# Altium PCB Main_Power_Uint_3rd.PcbDoc (part 2 of 3)
Units mil, origin at the board's own origin, x right, y up, seen from the top; angles counter-clockwise.
Board outline 3820 x 5360 mil, 6 copper layers (Top Layer, GND1, PWR, SIG, GND2, Bottom Layer), stack 34.824 mil thick; 251 components, 157 nets, 795 pads, 616 vias.
Unrouted connection lines stored in the file: 8.
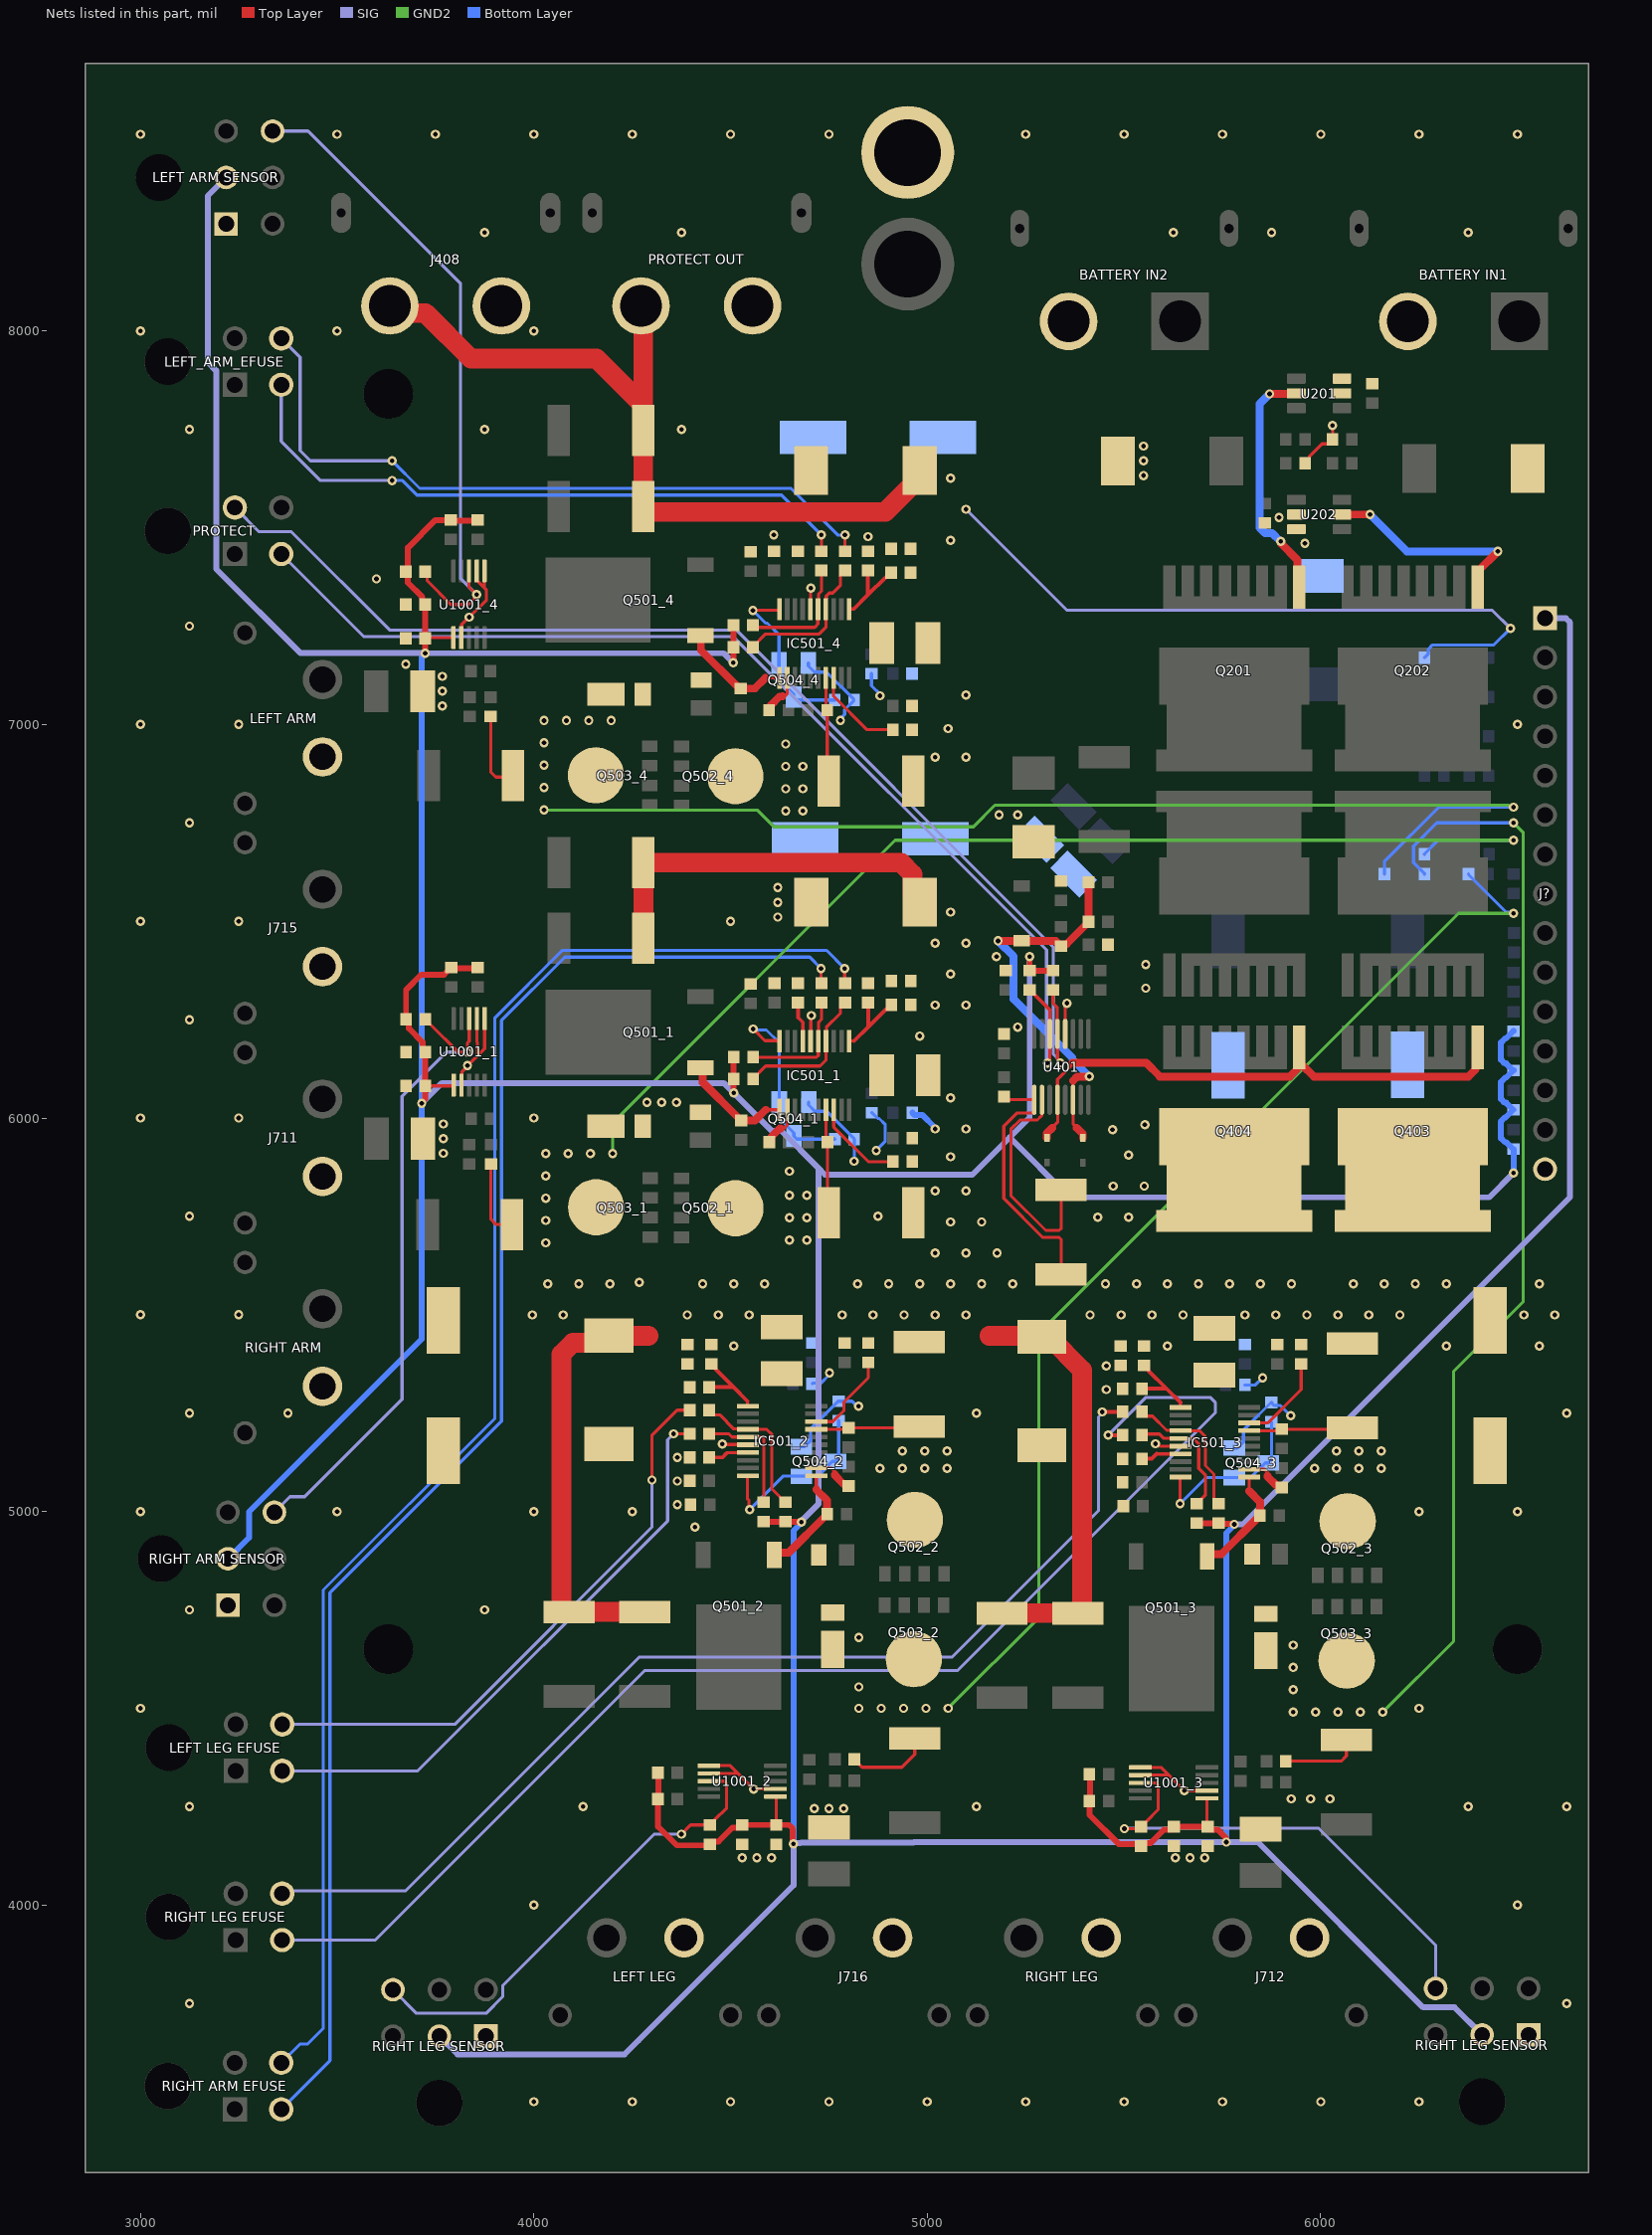
[diagram p6: the nets of this part, all layers, seen from the top]

## Part data
"48V OUT": library part CMP-019-000041-2, "XT_60 Connector FEMAIL", Design Item ID=XT_60F, Source=robit_connector.SchLib, System=Connector
"BATTERY IN1" "BATTERY IN2": library part CMP-019-000059-3, "Socket, DC supply, male, PIN: 2", Package=Package, Availability="Not in stock", Check_prices=https://www.snapeda.com/parts/XT60PW-M/AMASS/view-part/?ref=eda, Design Item ID=XT60PW-M, MF=AMASS, MP=XT60PW-M, Price=None, SnapEDA_Link=https://www.snapeda.com/parts/XT60PW-M/AMASS/view-part/?ref=snap, Source=robit_connector.SchLib, System=Connector
C201 C202 C203 C208 C502_1 C502_2 C502_3 C502_4 C507_1 C507_2 C507_3 C507_4 C1002_1 C1002_2 C1002_3 C1002_4 C1003_1 C1003_2 C1003_3 C1003_4: library part CMP-00021-3, "MLCC, 0.1µF, 10%, 100V, X7R, 0603", Capacitance=0.1µF, Dielectric=X7R, Package=0603, Tolerance=10%, Voltage Rating=100V, Mounting Type=SMD
C204 C205 C500_1 C500_2 C500_3 C500_4: library part UUX2A470MNL1GS, "Capacitor Polarised", Manufacturer_Name=Nichicon, Mouser Part Number=647-UUX2A470MNL1GS, Arrow Part Number=UUX2A470MNL1GS, Arrow Price/Stock=https://www.arrow.com/en/products/uux2a470mnl1gs/nichicon?utm_currency=USD&region=nac, Datasheet Link=https://componentsearchengine.com/Datasheets/1/UUX2A470MNL1GS.pdf, Height=10.5mm, Manufacturer_Part_Number=UUX2A470MNL1GS, Mouser Price/Stock=https://www.mouser.co.uk/ProductDetail/Nichicon/UUX2A470MNL1GS?qs=jZZh9D7uMhmPZMofMKn2Fg%3D%3D
C206 C207: library part CMP-00065-1, "MLCC, 4.7µF, 10%, 100V, X7R, 1210", Capacitance=4.7µF, Dielectric=X7R, Package=1210, Tolerance=10%, Voltage Rating=100V, Mounting Type=SMD
C401: library part CMP-00074-1, "MLCC, 470nF, 10%, 50V, X7R, 0603", Capacitance=470nF, Dielectric=X7R, Package=0603, Tolerance=10%, Voltage Rating=50V, Mounting Type=SMD
C403: library part CMP-00075-1, "MLCC, 47nF, 10%, 100V, X7R, 0603", Capacitance=47nF, Dielectric=X7R, Package=0603, Tolerance=10%, Voltage Rating=100V, Mounting Type=SMD
C501_1 C501_2 C501_3 C501_4: library part CMP-00030-3, "MLCC, 10µF, 10%, 100V, X7R, 1210", Capacitance=10µF, Dielectric=X7S, Package=1210, Tolerance=10%, Voltage Rating=100V, Mounting Type=SMD
C503_1 C503_2 C503_3 C503_4: library part CMP-00082-1, "MLCC, 22µF, 20%, 10V, X5R, 0603", Capacitance=22µF, Dielectric=X5R, Package=0603, Tolerance=20%, Voltage Rating=10V, Mounting Type=SMD
C505_1 C505_2 C505_3 C505_4: library part CMP-00088-1, "MLCC, 220nF, 10%, 25V, X7R, 0603", Capacitance=220nF, Dielectric=X7R, Package=0603, Tolerance=10%, Voltage Rating=25V, Mounting Type=SMD
C506_1 C506_2 C506_3 C506_4: library part CMP-00036-1, "MLCC, 1nF, 10%, 100V, X7R, 0603", Capacitance=1nF, Dielectric=X7R, Package=0603, Tolerance=10%, Voltage Rating=100V, Mounting Type=SMD
C508_1 C508_2 C508_3 C508_4: library part CMP-00046-1, "MLCC, 1nF, 10%, 50V, X7R, 0603", Capacitance=1nF, Dielectric=X7R, Package=0603, Tolerance=10%, Voltage Rating=50V, Mounting Type=SMD
C509_1 C509_2 C509_3 C509_4: library part CMP-00087-1, "MLCC, 470nF, 10%, 100V, C0G, 0805", Capacitance=470nF, Dielectric=X7R, Package=0805, Tolerance=10%, Voltage Rating=100V, Mounting Type=SMD
C1001_1 C1001_2 C1001_3 C1001_4: library part CMP-00023-3, "MLCC, 1µF, 10%, 100V, X7R, 0603", Capacitance=1uF, Dielectric=X7R, Package=1210, Tolerance=10%, Voltage Rating=100V, Mounting Type=SMD
C1004_1 C1004_2 C1004_3 C1004_4: library part CMP-00025-2, "MLCC, 1µF, 10%, 25V, X7R, 0603", Capacitance=1µF, Dielectric=X7R, Package=0603, Tolerance=10%, Voltage Rating=25V, Mounting Type=SMD
D201 D202 D203: "TVS Diode (Uni-directional)", Manufacturer_Name=LITTELFUSE, Mouser Part Number=576-SMDJ58A, Arrow Part Number=SMDJ58A, Arrow Price/Stock=https://www.arrow.com/en/products/smdj58a/littelfuse?utm_currency=USD&region=nac, Datasheet Link=https://mouser.componentsearchengine.com/Datasheets/2/SMDJ58A.pdf, Height=2.62mm, Manufacturer_Part_Number=SMDJ58A, Mouser Price/Stock=https://www.mouser.co.uk/ProductDetail/Littelfuse/SMDJ58A?qs=zL8PTTxXkF2zAaoXCy3ytQ%3D%3D
D401: library part CMP-1060-00175-1, "3 W Zener Voltage Regulator, 2-Pin SMB, Pb-Free, Tape and Reel", Manufacturer="On Semiconductor", ComponentLink1Description="Manufacturer URL", ComponentLink1URL=http://www.onsemi.com/, ComponentLink2Description=Datasheet, ComponentLink2URL=http://www.onsemi.com/pub_link/Collateral/1SMB5913BT3-D.PDF, ComponentLink3Description="Package Specification", ComponentLink3URL=http://www.onsemi.com/pub_link/Collateral/1SMB5913BT3-D.PDF, DatasheetVersion="Rev. 8", Mounting Technology="Surface Mount", PackageDescription="2-Pin Small Molded Package, J-Bend Lead, Body 4.33 x 3.625 mm", PackageReference=SMB-2-403A-03_H, PackageVersion="Rev. H, 05/2011", Packing="Tape and Reel", PartNumber=1SMB5945BT3G, RoHS=Pb-Free, VZ Typ (V)=68
D402 D403: library part CMP-301-000000-1, "Description", Manufacturer_Name=onsemi, Copyright="Copyright (C) 2025 Ultra Librarian. All rights reserved.", Design Item ID=SZMM5Z15VT1G, Manufacturer_Part_Number=SZMM5Z15VT1G, RefDes=RefDes, Source=SZMM5Z15VT1G.SchLib, Type=Type
D404: "Schottky Diode", Manufacturer_Name=MCC, Mouser Part Number=833-SMD110PL-TP, Arrow Part Number=SMD110PL-TP, Arrow Price/Stock=https://www.arrow.com/en/products/smd110pl-tp/micro-commercial-components?utm_currency=USD&region=europe, Datasheet Link=https://www.mccsemi.com/pdf/Products/SMD15PL-SMD1200PL(SOD-123FL).pdf, Height=1.35mm, Manufacturer_Part_Number=SMD110PL-TP, Mouser Price/Stock=https://www.mouser.co.uk/ProductDetail/Micro-Commercial-Components-MCC/SMD110PL-TP?qs=xjxbgUsuSIBtRX%252BtbqnRwQ%3D%3D
D501_1 D501_2 D501_3 D501_4: "TVS Diode (Uni-directional)", Manufacturer_Name=MCC, Datasheet Link=https://www.mccsemi.com/pdf/Products/SMLJ5.0AQ_SMLJ85CAQ(SMC).pdf, Height=2.823mm, Manufacturer_Part_Number=SMLJ58AQ-TP
D502_1 D502_2 D502_3 D502_4: library part CMP-2000-05099-1, "1 A High Voltage Schottky Barrier Rectifier, 0.62 V, -55 to 175 degC, 2- Pin POWERDI123, Pb-Free, Tape and Reel", Average Rectified Current-Max=1A, Forward Voltage=0.77V, Manufacturer="Diodes Inc", Peak Current-Max=40A, Reverse Current-Max=1µA, Reverse Voltage-Max [Vrrm]=100V, Datasheet URL=https://datasheet.ciiva.com/15144/getdatasheetpartid-44146-15144126.pdf, Datasheet Version=Sep-14, Manufacturer URL=http://www.diodes.com/
IC501_1 IC501_2 IC501_3 IC501_4: "Integrated Circuit", Manufacturer_Name="Texas Instruments", Datasheet Link=https://www.ti.com/lit/ds/slusee5c/slusee5c.pdf, Height=1.1mm, Manufacturer_Part_Number=TPS48111-Q1
J408 "PROTECT OUT": library part CMP-019-000058-2, "Socket DC Supply Connector Female", Package=Package, Availability="Not in stock", Check_prices=https://www.snapeda.com/parts/XT60PW-F/AMASS/view-part/?ref=eda, Design Item ID=XT60PW-F, MF=AMASS, MP=XT60PW-F, Price=None, SnapEDA_Link=https://www.snapeda.com/parts/XT60PW-F/AMASS/view-part/?ref=snap, Source=robit_connector.SchLib, System=Connector
J711 J712 J715 J716 "LEFT ARM" "LEFT LEG" "RIGHT ARM" "RIGHT LEG": "Connector", Manufacturer_Name=Amass, Datasheet Link=https://www.tme.eu/Document/ce4077e36b79046da520ca73227e15de/XT30PW%20SPEC.pdf, Height=5mm, Manufacturer_Part_Number=XT30PW-F
J?: "Connector", Manufacturer_Name="Wurth Elektronik", Datasheet Link=https://www.we-online.com/catalog/datasheet/61301511821.pdf, Height=8.65mm, Manufacturer_Part_Number=61301511821
"LEFT ARM SENSOR" "RIGHT ARM SENSOR" "RIGHT LEG SENSOR" "RIGHT LEG SENSOR": "Connector", Manufacturer_Name=Molex, Mouser Part Number=538-43045-0600, Arrow Part Number=43045-0600, Arrow Price/Stock=https://www.arrow.com/en/products/43045-0600/molex?region=nac, Datasheet Link=https://www.molex.com/pdm_docs/sd/430450200_sd.pdf, Height=9.9mm, Manufacturer_Part_Number=43045-0600, Mouser Price/Stock=https://www.mouser.co.uk/ProductDetail/Molex/43045-0600?qs=mrPiglD9aYJ8CzJ%2FE2PNbw%3D%3D
"LEFT LEG EFUSE" LEFT_ARM_EFUSE PROTECT "RIGHT ARM EFUSE" "RIGHT LEG EFUSE": library part CMP-04776-000002-1, "CONN HEADER R/A 4POS 3MM", Current Rating=8.5A, Manufacturer=Molex, Temperature="-40°C to +105°C", Temperature Range High=+105°C, Temperature Range Low=-40°C, Voltage Rating=600V, Automotive=No, Category=Conn, ComponentLink2Description=Datasheet, ComponentLink2URL=https://www.molex.com/webdocs/datasheets/pdf/en-us/0430450400_PCB_HEADERS.pdf, Conn Gender=Male, Conn Orientation="Right Angle", Contact Material=Tin,Nickel, Device Class L1=Connectors, Device Class L2="Headers and Wire Housings", Device Class L3=unset, Digikey Description="CONN HEADER R/A 4POS 3MM", Footprint Url=https://www.molex.com/pdm_docs/sd/430450400_sd.pdf, Height=9.27mm, Is Female=yes, Lead Free=Yes, Manufacturer Part Number=43045-0400, Number Of Contacts=4, Number of Rows=2, Octopart=https://octopart.com/43045-0400-molex-287063, Package=43045-0400, Pitch=3mm, RoHS=TRUE
Q201 Q202 Q401 Q402 Q403 Q404: "TRANS MOSFET N-CH 100V 300A 8HSOF", Digikey Part Number=IPT015N10N5ATMA1CT-ND, Manufacturer=Infineon, Mouser Part Number=726-IPT015N10N5ATMA1, Package=HSOF8, Part Number=IPT015N10N5, Temperature="-55°C to +175°C", Temperature Range High=+175°C, Temperature Range Low=-55°C, ComponentLink1Description=Upverter, ComponentLink1URL=https://upverter.com/upn/revision/59ddb1136ed40b7f/, ComponentLink2Description=Datasheet, ComponentLink2URL=http://www.infineon.com/dgdl/Infineon-IPT015N10N5-DS-v02_02-EN.pdf?fileId=5546d4624a75e5f1014ac94680661aff, Digikey Description="TRANS MOSFET N-CH 100V 300A 8HSOF", helpURL=https://upverter.com/upn/revision/59ddb1136ed40b7f/, Lead Free=yes, RoHS=TRUE, Supplier 1=Digi-Key, Supplier 2=Mouser, Supplier Part Number 1=IPT015N10N5ATMA1CT-ND, Supplier Part Number 2=726-IPT015N10N5ATMA1
Q501_1 Q501_2 Q501_3 Q501_4: library part CMP-1091-00169-1, "N-Channel OptiMOS 3 Power-Transistor, 100 V VDS, 90 A ID, -55 to 175 degC, PG-TO252-3-11, Reel, Green", Manufacturer=Infineon, ComponentLink1Description="Manufacturer URL", ComponentLink1URL=http://www.infineon.com/, ComponentLink2Description=Datasheet, ComponentLink2URL=http://www.infineon.com/dgdl/IPD068N10N3+G_Rev2.1.pdf?folderId=db3a304313b8b5a60113cee8763b02d7&fileId=db3a30431ce5fb52011d1eb7aeb615d1, ComponentLink3Description="Package Specification", ComponentLink3URL=http://www.infineon.com/dgdl/IPD160N04L_rev1.0.pdf?folderId=db3a3043163797a6011643468e7505a4&fileId=db3a3043163797a60116436401cf05cf, DatasheetVersion="Rev. 2.1", Green=TRUE, ID (max)="90Â A", IDpuls (max)="360Â A", Mounting Technology="Surface Mount", PackageDescription="3-Pin Plastic (Green) Transistor Single Outline Package, 6.57 x 6.1 mm Body, 2.29 mm Pitch", PackageReference=PG-TO252-3-11, PackageVersion="Rev. 02, 03/2007", Packing=Reel, PartNumber="IPD068N10N3 G", Polarity=N, Ptot (max)="150Â W", QG="51Â nC", RDS (on) (max)="6.8Â mOhm", Rth="1Â K/W", RthJA (max)="62 K/W", RthJC (max)="1 K/W", VDS (max)="100Â V", VGS(th) (max)="3.5Â V", VGS(th) (min)="2Â V"
Q502_1 Q502_2 Q502_3 Q502_4 Q503_1 Q503_2 Q503_3 Q503_4: library part CMP-00278-108017151-1, "NVMFS015N10MCLT1G Mosfet, N-Ch, 100V, 47.1A, Dfn Rohs Compliant: Yes", Manufacturer Lifecycle Status=ACTIVE, Lifecycle Status=Production, NexarPartId=108017151
Q504_1 Q504_2 Q504_3 Q504_4: library part CMP-1670-00008-1, "NPN General Purpose Amplifier, 40 V, 0.2 A, -55 to 150 degC, 3-Pin SOT23, RoHS, Tape and Reel", Capacitance="1.8E-11 f", Frequency="12.288 MHz", Frequency Tolerance=30ppm, Load Capacitance="18 pF", Max Operating Temperature=70degC, Min Operating Temperature=-20degC, Package Quantity=1000, ComponentLink1Description="Manufacturer URL", ComponentLink1URL=https://www.fairchildsemi.com/, ComponentLink2Description=Datasheet, ComponentLink2URL=https://www.fairchildsemi.com/datasheets/MM/MMBT3904.pdf, ComponentLink3Description="Package Specification", ComponentLink3URL=http://www.fairchildsemi.com/dwg/MA/MA03D.pdf, DatasheetVersion="Rev. 1.1.0, 10/2014", ESR="40 Ohm", Height="0.041 inch", Length="0.197 inch", Mount="Surface Mount", PackageDescription="3-Pin Small Outline Transistor, Body 2.92 x 1.325 mm, Pitch 0.95 mm", PackageReference=SOT23-3, Packaging="Tape and Reel", Pins=4, REACH SVHC="No SVHC", RoHSCompliant=True, Tolerance=30ppm, Width="0.126 inch"
R201 R202 R508_1 R508_2 R508_3 R508_4 R510_1 R510_2 R510_3 R510_4: library part CMP-00048-1, "Chip resistor, 100 Ohm, 1%, 0.1W, 0603", Package=0603, Power Rating=100mW, Resistance=100, Tolerance=1%, Voltage Rating=75V, Mounting Type=SMD
R203 R204 R205 R206 R207 R208 R413 R413_1 R413_2 R413_3 R413_4 R414 R414_1 R414_2 R414_3 R414_4: library part CMP-00064-1, "Chip resistor, 22k Ohm, 1%, 0.1W, 0603", Package=0603, Power Rating=100mW, Resistance=22k, Tolerance=1%, Voltage Rating=75V, Mounting Type=SMD
R401: library part CMP-00067-2, "Chip resistor, 464k Ohm, 1%, 0.1W, 0603", Package=0603, Power Rating=100mW, Resistance=464k, Tolerance=1%, Voltage Rating=75V, Mounting Type=SMD
R402: library part CMP-00068-1, "Chip resistor, 6.65k Ohm, 1%, 0.1W, 0603", Package=0603, Power Rating=100mW, Resistance=6.65k, Tolerance=1%, Voltage Rating=75V, Mounting Type=SMD
R403 R407 R415 R416 R515_1 R515_2 R515_3 R515_4 R516_1 R516_2 R516_3 R516_4: library part CMP-00032-1, "Chip resistor, 10k Ohm, 1%, 0.1W, 0603", Package=0603, Power Rating=100mW, Resistance=10k, Tolerance=1%, Voltage Rating=75V, Mounting Type=SMD
R404: library part CMP-00066-1, "Chip resistor, 2.2k Ohm, ±1%, 2W, 2512", Package=2512, Power Rating=2W, Resistance=2.2k, Tolerance=1%, Mounting Type=SMD
R405: library part CMP-00073-2, "Chip resistor, 1.3m Ohm, ±1%, 3W, 2512", Package=2512, Power Rating=3W, Resistance=1.3m, Tolerance=1%, Mounting Type=SMD
R406: library part CMP-00070-1, "Chip resistor, 442k Ohm, 1%, 0.1W, 0603", Package=0603, Power Rating=100mW, Resistance=442k, Tolerance=1%, Voltage Rating=75V, Mounting Type=SMD
R408: library part CMP-00069-1, "Chip resistor, 470 Ohm, 1%, 0.1W, 0603", Package=0603, Power Rating=100mW, Resistance=470, Tolerance=1%, Voltage Rating=75V, Mounting Type=SMD
R409 R410 R1003_1 R1003_2 R1003_3 R1003_4 R1004_1 R1004_2 R1004_3 R1004_4: library part CMP-00010-8, "Chip resistor, 10 Ohm, 1%, 0.1W, 0603", Package=0603, Power Rating=100mW, Resistance=10, Tolerance=1%, Voltage Rating=50V, Mounting Type=SMD
R501_1 R501_2 R501_3 R501_4: library part CMP-00071-1, "Chip resistor, 470k Ohm, 1%, 0.1W, 0603", Package=0603, Power Rating=100mW, Resistance=470k, Tolerance=1%, Voltage Rating=75V, Mounting Type=SMD
R502_1 R502_2 R502_3 R502_4: library part CMP-00072-1, "Chip resistor, 16.2k Ohm, 0.1%, 0.1W, 0603", Package=0603, Power Rating=100mW, Resistance=16.2k, Tolerance=1%, Voltage Rating=75V, Mounting Type=SMD
R503_1 R503_2 R503_3 R503_4: library part CMP-00076-1, "Chip resistor, 14.7k Ohm, 0.1%, 0.1W, 0603", Package=0603, Power Rating=100mW, Resistance=14.7k, Tolerance=1%, Voltage Rating=75V, Mounting Type=SMD
R504_1 R504_2 R504_3 R504_4: library part CMP-00090-1, "Chip resistor, 66k Ohm, 1%, 0.1W, 0603", Package=0603, Power Rating=100mW, Resistance=62k, Tolerance=1%, Voltage Rating=75V, Mounting Type=SMD
R505_1 R505_2 R505_3 R505_4 R506_1 R506_2 R506_3 R506_4 R1009_1 R1009_2 R1009_3 R1009_4: library part CMP-00012-6, "Chip resistor, 1k Ohm, 1%, 0.1W, 0603", Package=0603, Power Rating=100mW, Resistance=1k, Tolerance=1%, Voltage Rating=50V, Mounting Type=SMD
R509_1 R509_2 R509_3 R509_4: library part CMP-00079-1, "Chip resistor, 7.5k Ohm, 1%, 0.1W, 0603", Package=0603, Power Rating=100mW, Resistance=7.5k, Tolerance=1%, Voltage Rating=75V, Mounting Type=SMD
R511_1 R511_2 R511_3 R511_4: library part CMP-00089-1, "Chip resistor, 1m Ohm, ±1%, 3W, 2512", Package=2512, Power Rating=3W, Resistance=1m, Tolerance=1%, Mounting Type=SMD
R512_1 R512_2 R512_3 R512_4 R513_1 R513_2 R513_3 R513_4: library part CMP-00081-1, "Chip resistor, 220 Ohm, ±1%, 2W, 2512", Package=2512, Power Rating=2W, Resistance=220, Tolerance=1%, Mounting Type=SMD
R514_1 R514_2 R514_3 R514_4: library part CMP-00080-1, "Chip resistor, 220 Ohm, 1%, 0.1W, 0603", Package=0603, Power Rating=100mW, Resistance=220, Tolerance=1%, Voltage Rating=75V, Mounting Type=SMD
R1002_1 R1002_2 R1002_3 R1002_4: library part CMP-00015-10, "Chip resistor, 1m Ohm, ±1%, 5W, 2512", Package=2512, Power Rating=5W, Resistance=1m, Tolerance=1%, Mounting Type=SMD
R1005_1 R1005_2 R1005_3 R1005_4 R1006_1 R1006_2 R1006_3 R1006_4 R1008_1 R1008_2 R1008_3 R1008_4: library part CMP-00011-6, "Chip resistor, 4.7k Ohm, 1%, 0.1W, 0603", Package=0603, Power Rating=100mW, Resistance=4.7k, Tolerance=1%, Voltage Rating=75V, Mounting Type=SMD
U201 U202: library part CMP-026-000034-1, "5-V to 75-V 400-uA IQ ORing FET controller 6-SOT-23-THIN -40 to 125"
U401: library part CMP-0474-00539-1, "Surge Stopper with Ideal Diode, 4 to 80 V Vin, 16-pin SOP (MS-16), -40 to 85 degC, Pb-Free", Extended Temp="C, I, H", Manufacturer="Linear Technology", Power Good=no, Active Limiting=yes, Circuit Breaker Accuracy(%)=10, Circuit Breaker Threshold="50 mV", Circuit Breakers(#)=1, ComponentLink1Description="Manufacturer URL", ComponentLink1URL=http://www.linear.com/, ComponentLink2Description=Datasheet, ComponentLink2URL=http://cds.linear.com/docs/en/datasheet/436412f.pdf, ComponentLink3Description="Package Specification", ComponentLink3URL=http://cds.linear.com/docs/en/packaging/05081669_A_MS16.pdf, Fast Comparator=no, Mounting Technology="Surface Mount", PackageDescription="16-Pin Plastic MSOP, Body 4.04 x 3.00 mm, Pitch 0.50 mm", PackageReference=MS16, PackageVersion="Rev. Ã˜, 06/2010", PartNumber=LTC4364IMS-2#PBF, RoHS=TRUE, Vin Range="4 to 80 V"
U1001_1 U1001_2 U1001_3 U1001_4: library part CMP-303-000000-1, "85-V, 20-bit, ultra-precise, I2C output current/voltage/power/energy/charge monitor with alert", Package="VSSOP-10 Texas Instruments", Check_prices=https://www.snapeda.com/parts/INA228AIDGSR/Texas+Instruments/view-part/?ref=eda, Component Type=Standard, Design Item ID=INA228AIDGSR, MF="Texas Instruments", MP=INA228AIDGSR, Pin Count=10, SnapEDA_Link=https://www.snapeda.com/parts/INA228AIDGSR/Texas+Instruments/view-part/?ref=snap, Source=INA228AIDGSR.SchLib

## Free pads (board coordinates)
  round 125.98 hole 125.98 unplated: 3(3630,4650) 3(3630,7840) 3(6500,4650)

## Via types
v1: diameter 23.62, hole 11.81, Top Layer to Bottom Layer, tented both sides, 369 vias
v2: diameter 23.62, hole 11.81, Top Layer to Bottom Layer, 240 vias
v3: diameter 23.62, hole 11.81, Top Layer to Bottom Layer, tented top, 7 vias

## Nets (pads, with @x,y where several pads share a name; then routed paths per layer and width w, separated by ;. In a path a pad name is that pad's centre, name@x,y a point inside that pad or via, vN(x,y) a via of type N, cw(c..) or ccw(c..) an arc to the next point about the centre after c; other vN are vias at no path point)
3V3: "LEFT ARM SENSOR.2" "RIGHT ARM SENSOR.2" "RIGHT LEG SENSOR.2" C1003_1.2 C1003_2.2 C1003_3.2 C1003_4.2 C1004_1.2 C1004_2.2 C1004_3.2 C1004_4.2 J?.1 R415.1 R416.1 R515_1.1 R515_2.1 R515_3.1 R515_4.1 R516_1.1 R516_2.1 R516_3.1 R516_4.1 R1005_1.1 R1005_2.1 R1005_3.1 R1005_4.1 R1006_1.1 R1006_2.1 R1006_3.1 R1006_4.1 R1008_1.2 R1008_2.2 R1008_3.2 R1008_4.2 R1009_1.2 R1009_2.2 R1009_3.2 R1009_4.2 U1001_1.6 U1001_2.6 U1001_3.6 U1001_4.6 | length 20230.2
  Top Layer w8: C1003_4.2@3723.82,7218.62 3725.91,7220.71 U1001_4.6@3795.75,7220.71 ; C1003_1.2@3724.41,6081.44 3794.82,6081.44 3796.33,6082.95 U1001_1.6@3796.33,6083.53 ; U1001_2.6@4614.09,4275.35 4614.67,4275.35 4616.18,4273.84 C1003_2.2@4616.18,4203.43 ; U1001_3.6@5710.75,4271.06 5710.75,4201.23 C1003_3.2@5712.84,4199.14
  Top Layer w15: v2(3715.19,6037.62) 3715.19,6039.95 3724.42,6049.19 C1003_1.2@3724.42,6080.47 ; C1003_4.2@3723.82,7218.62 3723.82,7303.82 3724.81,7304.8 3716.56,7313.05 3716.56,7323.44 3679.52,7360.48 3679.52,7383.01 R1008_4.2@3674.61,7387.91 3679.87,7393.17 3679.87,7449.38 3749.89,7519.41 R1005_4.1@3789.22,7519.41 3790.75,7517.87 3855.62,7517.87 R1006_4.1@3857.16,7519.41 ; v2(3723.84,7181.19) C1003_4.2@3723.82,7218.62 ; C1003_1.2@3724.41,6080.48 3724.41,6166.64 3725.39,6167.62 3717.23,6175.78 3717.23,6192.77 3682.46,6227.54 3682.46,6243.47 R1008_1.2@3675.2,6250.73 3675.2,6325.64 3713.83,6364.28 3771.85,6364.28 3781.55,6373.98 3781.55,6374.96 3788.82,6382.23 R1005_1.1@3789.8,6382.23 3791.34,6380.69 3856.21,6380.69 R1006_1.1@3857.74,6382.23 ; R1006_2.1@4315.39,4336.76 4316.93,4335.22 4316.93,4270.36 R1005_2.1@4315.39,4268.82 4315.39,4199.54 4363.25,4151.69 4444.37,4151.69 4454.15,4161.48 4469.67,4161.48 4504.64,4196.45 4524.01,4196.45 4530.98,4203.43 C1003_2.2@4616.18,4203.43 4649.19,4203.44 4658.35,4194.28 4658.35,4156.84 v2(4660,4155.19) ; v2(4506.76,7156.73) 4507.15,7157.12 4507.15,7196.73 4507.15,7252 R516_4.1@4507.55,7252.4 ; R515_1.1@4507.58,6088.9 4507.58,6098.9 4507.97,6098.51 v2(4507.97,6063.58) ; R515_1.1@4507.97,6098.9 4507.58,6099.29 4507.58,6154.18 R516_1.1@4507.97,6154.57 ; R516_2.1@4584.33,4974.27 4584.73,4973.88 4640,4973.88 4679.61,4973.88 v2(4680,4973.48) ; v2(5260,6410) 5260,6374.92 R416.1@5259.68,6374.61 R415.1@5319.49,6374.61 ; R1006_3.1@5412.05,4332.47 5413.59,4330.94 5413.59,4266.07 R1005_3.1@5412.05,4264.53 5412.05,4229.43 5486.3,4155.18 5538.29,4155.18 R1008_3.2@5543.55,4149.93 5550.81,4157.19 5567.19,4157.19 5601.87,4191.87 5620.38,4191.87 5627.64,4199.14 C1003_3.2@5712.84,4199.14 5719.99,4191.98 5738.02,4191.98 5758.35,4171.65 5758.35,4161.65 v2(5760,4160) ; R516_3.1@5684.33,4970.79 5684.73,4970.39 5740,4970.39 5741.17,4969.22 5778.45,4969.22 v2(5780.01,4967.65)
  SIG w15: 3217.95,8390 3171.53,8343.58 3171.53,7920.21 3192.67,7899.06 3192.67,7395.42 3406.9,7181.19 v2(3723.84,7181.19) ; v2(3715.19,6037.62) 3766.47,6088.9 4482.66,6088.9 4604.07,5967.49 4628.6,5967.49 4723.04,5873.04 ; v2(3723.84,7181.19) 3723.92,7181.11 4482.38,7181.11 v2(4506.76,7156.73) ; 3760,3666.79 3806.42,3620.37 4230.37,3620.37 4265.64,3655.64 4660,4050 v2(4660,4155.19) 4661.65,4156.84 4677.16,4156.84 4679.31,4158.99 4965.26,4158.99 4966.26,4160 5840,4160 6260,3740 6340.08,3740 6410,3670.08 ; v2(4680,4973.48) 4680,4975.82 4723.04,5018.86 4723.04,5873.04 ; v2(5260,6410) 5260,6001.42 5209.29,5950.71 ; v2(5780.01,4967.65) 5802.29,4967.65 6633.62,5798.98 6633.62,7259 6622.62,7270 J?.1@6570,7270 ; v2(6490,5860) 6428.46,5798.46 5361.54,5798.46 5209.29,5950.71 ; 4723.04,5873.04 4740.1,5855.99 5114.57,5855.99 5209.29,5950.71
  Bottom Layer w15: 3222.63,4880 3276.36,4933.73 3276.36,4999.38 3715.19,5438.21 v2(3715.19,6037.62) ; v2@3717.18,6039.61 3715.19,6041.6 3715.19,7170.21 3723.84,7178.86 v2(3723.84,7181.19) ; v2(4660,4155.19) 4660,4951.15 4680,4971.15 v2(4680,4973.48) ; v2(5760,4160) 5760,4945.31 5780.01,4965.32 v2(5780.01,4967.65) ; v2(6490,5860) R1009_4.2@6490,5920.79 6489.02,5920.79 6471.15,5938.66 6467.5,5938.66 6457.75,5948.4 6457.75,5991.6 6467.42,6001.26 6469.49,6001.26 6489.02,6020.79 6471.07,6038.74 6467.42,6038.74 6457.75,6048.4 6457.75,6091.6 6468.36,6102.21 6470.43,6102.21 R1009_2.2@6489.02,6120.79 ; R1009_2.2@6490,6120.79 R1009_2.2@6489.02,6120.79 ; R1009_1.2@6490,6220.79 6489.02,6220.79 6470.43,6202.2 6468.36,6202.2 6457.75,6191.6 6457.75,6148.4 6467.42,6138.74 6471.07,6138.74 R1009_2.2@6489.02,6120.79
ALERT_1: "RIGHT ARM SENSOR.6" R1008_1.1 U1001_1.3 | length 1655.2
  Top Layer w8: R1008_1.1@3724.41,6250.73 3724.41,6249.74 3735.17,6238.98 3736.16,6238.98 3807.52,6167.62 v2(3831.43,6167.62) 3831.43,6191.16 3835.7,6195.43 U1001_1.3@3835.7,6252.82
  SIG w8: 3340.74,4998.11 3380.1,5037.47 3417.55,5037.47 3665,5284.92 3665,6055 3777.62,6167.62 v2(3831.43,6167.62)
ALERT_2: "RIGHT LEG SENSOR.6"@3641.89,3784.9 R1008_2.1 U1001_2.3 | length 1215.1
  Top Layer w8: v2(4374.98,4180) 4398.4,4203.43 R1008_2.1@4446.89,4203.43 ; U1001_2.3@4444.8,4314.72 4484.24,4314.72 4490,4308.96 4490,4246.53 4459.14,4215.67 4459.14,4214.69 R1008_2.1@4447.88,4203.43
  SIG w8: 3641.89,3784.9 3701.81,3724.98 3878.89,3724.98 3921.03,3767.12 3921.03,3795.36 4305.67,4180 v2(4374.98,4180)
ALERT_3: "RIGHT LEG SENSOR.6"@6291.89,3788.19 R1008_3.1 U1001_3.3 | length 1239.7
  Top Layer w8: v2(5500.95,4194.08) 5538.49,4194.08 R1008_3.1@5543.55,4199.14 ; U1001_3.3@5541.46,4310.43 5580.9,4310.43 5586.66,4304.67 5586.66,4242.25 5555.8,4211.39 5555.8,4210.4 R1008_3.1@5544.53,4199.14
  SIG w8: v2(5500.95,4194.08) 5502.19,4195.31 5994.69,4195.31 6291.89,3898.11 6291.89,3788.19
ALERT_4: "LEFT ARM SENSOR.6" R1008_4.1 U1001_4.3 | length 1702.8
  Top Layer w8: R1008_4.1@3723.82,7387.91 3729.17,7382.56 3729.17,7364.85 3789.22,7304.8 3833.83,7304.8 3854.8,7325.77 v2(3854.8,7330) 3854.18,7330 3835.12,7349.06 U1001_4.3@3835.12,7390
  SIG w8: 3336.06,8508.11 3425.93,8508.11 3814,8120.04 3814,7370.8 v2(3854.8,7330)
BST_1: C505_1.1 IC501_1.12 | length 107.4
  Top Layer w8: 4627.87,5973.9 4635.7,5973.9 4644.2,5982.4 IC501_1.12@4644.2,6020.95
  Top Layer w20: C505_1.1@4598.37,5938.51 4603.13,5943.27 4603.13,5951.44 4625.59,5973.9 4627.87,5973.9
BST_2: C505_2.1 IC501_2.12 | length 107.4
  Top Layer w8: IC501_2.12@4717.95,5110.5 4756.5,5110.5 4765,5102 4765,5094.17
  Top Layer w20: 4765,5094.17 4765,5091.88 4787.46,5069.43 4795.63,5069.43 C505_2.1@4800.39,5064.66
BST_3: C505_3.1 IC501_3.12 | length 107.4
  Top Layer w8: IC501_3.12@5817.95,5107.02 5856.5,5107.02 5865,5098.52 5865,5090.68
  Top Layer w20: 5865,5090.68 5865,5088.4 5887.46,5065.94 5895.63,5065.94 C505_3.1@5900.39,5061.18
BST_4: C505_4.1 IC501_4.12 | length 108.9
  Top Layer w8: 4632,7071.83 4637.97,7071.83 4643.78,7077.64 IC501_4.12@4643.78,7118.77
  Top Layer w20: C505_4.1@4597.94,7036.33 4602.7,7041.1 4602.7,7049.27 4624.52,7071.08 4631.25,7071.08 4632,7071.83
CS+_1: IC501_1.18 R510_1.1 | length 234.4
  Top Layer w8: IC501_1.18@4762.31,6020.95 4762.31,5977.09 4850.5,5888.9 R510_1.1@4916.3,5888.9
CS+_2: IC501_2.18 R510_2.1 | length 233.3
  Top Layer w8: IC501_2.18@4717.95,5228.61 4760.02,5228.61 4788.18,5256.76 4788.18,5278.26 4850,5340.08 R510_2.1@4850,5382.6
CS+_3: IC501_3.18 R510_3.1 | length 236.3
  Top Layer w8: IC501_3.18@5817.95,5225.13 5865.13,5225.13 5950,5310 R510_3.1@5950,5379.12
CS+_4: IC501_4.18 R510_4.1 | length 236.3
  Top Layer w8: IC501_4.18@4761.89,7118.78 4761.89,7071.6 4846.76,6986.73 R510_4.1@4915.88,6986.73
CS-_1: C506_1.2 IC501_1.17 Q502_1.5-6 R511_1.2 | length 265.1
  Top Layer w8: IC501_1.17@4742.63,6020.95 4742.63,5942.19 C506_1.2@4746.31,5938.51 4746.31,5762.5 R511_1.2@4749.9,5758.9
  other v3: 4650,5690 4693.98,5690 4650,5746.84 4693.98,5746.84 4650,5803.68 4693.98,5803.68 4650,5864.81
CS-_2: C506_2.2 IC501_2.17 Q502_2.5-6 R511_2.2 | length 265.1
  Top Layer w8: IC501_2.17@4717.95,5208.92 4796.71,5208.92 C506_2.2@4800.39,5212.6 4976.41,5212.6 R511_2.2@4980,5216.2
  other v1: 4879.48,5110 4936.32,5110 4993.16,5110 5050,5110 4936.32,5153.98 4993.16,5153.98 5050,5153.98
CS-_3: C506_3.2 IC501_3.17 Q502_3.5-6 R511_3.2 | length 265.1
  Top Layer w8: IC501_3.17@5817.95,5205.44 5896.71,5205.44 C506_3.2@5900.39,5209.12 6076.41,5209.12 R511_3.2@6080,5212.72
  other v1: 5983.92,5109.24 6040,5110 6096.84,5110 6153.68,5110 6040,5153.98 6096.84,5153.98 6153.68,5153.98
CS-_4: C506_4.2 IC501_4.17 Q502_4.5-6 R511_4.2 | length 265.1
  Top Layer w8: IC501_4.17@4742.2,7118.78 4742.2,7040.01 C506_4.2@4745.88,7036.33 4745.88,6860.32 R511_4.2@4749.48,6856.73
  other v1: 4640,6780 4683.98,6780 4640,6836.84 4683.98,6836.84 4640,6893.68 4683.98,6893.68 4640,6950.52
DGATE: D403.1 Q403.1 Q404.1 U401.4 | length 1397
  Top Layer w8: 5317.39,5974.89 5331.3,5988.81 5331.3,6045.86 U401.4@5330.83,6046.34 5330.83,6097.81 5362.74,6129.72 5362.74,6134 5368.74,6140
  Top Layer w20: D403.1@5303.85,5949.83 5303.85,5961.35 5317.39,5974.89 ; 5368.74,6140 5556.28,6140 5591.03,6105.25 5921.73,6105.25 5939.61,6123.13 5939.61,6134.25 Q404.1@5945.35,6140 ; Q404.1@5945.35,6179.37 Q404.1@5945.35,6140 ; Q403.1@6398.98,6179.37 6393.23,6173.62 6393.23,6123.13 6375.35,6105.25 5982.15,6105.25 5953.15,6134.25 5951.1,6134.25 Q404.1@5945.35,6140
DIOD_1: C508_1.1 IC501_1.10 Q504_1.1 Q504_1.3 | length 521
  Top Layer w8: v2(4557.19,6226.4) 4587.19,6196.4 4623.24,6196.4 IC501_1.10@4624.52,6195.12
  Bottom Layer w8: v2(4557.19,6226.4) 4559.95,6223.64 4591.02,6223.64 4623.66,6190.99 Q504_1.1@4623.66,6040.8 4623.66,5999.46 4661.06,5962.06 Q504_1.3@4661.06,5954.19 4668.94,5946.31 C508_1.1@4765.1,5946.32
DIOD_2: C508_2.1 IC501_2.10 Q504_2.1 Q504_2.3 | length 465.5
  Top Layer w8: IC501_2.10@4543.78,5090.81 4542.5,5089.53 4542.5,5032.57 4546.5,5028.57 4546.5,5006.41 v2(4548.15,5004.76)
  Bottom Layer w8: v2(4548.15,5004.76) 4633.18,5089.79 4721.4,5089.79 4758.8,5127.19 Q504_2.3@4766.68,5127.19 4774.55,5135.07 C508_2.1@4774.55,5231.23
DIOD_3: C508_3.1 IC501_3.10 Q504_3.1 Q504_3.3 | length 442.3
  Top Layer w8: v2(5642.5,5020) 5642.5,5086.05 IC501_3.10@5643.78,5087.33
  Bottom Layer w8: v2(5642.5,5020) 5708.81,5086.31 Q504_3.1@5780.06,5086.31 5821.4,5086.31 5858.8,5123.71 Q504_3.3@5866.68,5123.71 5874.55,5131.58 C508_3.1@5874.55,5227.75
DIOD_4: C508_4.1 IC501_4.10 Q504_4.1 Q504_4.3 | length 441.9
  Top Layer w8: v2(4556.76,7289.99) 4622.19,7289.99 4624.09,7291.9 IC501_4.10@4624.09,7292.95
  Bottom Layer w8: v2(4556.76,7289.99) 4589.29,7257.46 4593.53,7257.46 4623.07,7227.92 Q504_4.1@4623.07,7156.66 4623.07,7115.33 4660.47,7077.93 Q504_4.3@4660.47,7070.05 4668.35,7062.18 C508_4.1@4764.51,7062.18
EFUSE_RAW_OUT1: D502_1.2 Q503_1.5-6 R413_1.2 R1002_1.1 R1004_1.2 | length 3114.5
  Top Layer w8: R1004_1.2@3890.98,5883.01 3890.98,5742.42 3904.05,5729.35 R1002_1.1@3952.68,5729.35
  GND2 w8: v1(4200.52,5910) 4200.52,5988 4918.27,6705.75 v1(6490,6705.75)
  Bottom Layer w8: R413_1.2@6263.35,6670 6263.35,6670.98 6298.11,6705.75 v1(6490,6705.75)
  other v1: 4030,5682.64 4030,5739.48 4030,5796.32 4030,5853.16 4030,5910 4086.84,5910 4143.68,5910
EFUSE_RAW_OUT2: D502_2.2 Q503_2.5-6 R413_2.2 R1002_2.1 R1004_2.2 | length 3078.6
  Top Layer w8: R1004_2.2@4814.61,4370 4814.61,4369.02 4825.87,4357.75 4826.85,4357.75 4834.61,4350 4935.2,4350 4968.27,4383.07 R1002_2.1@4968.27,4431.69
  GND2 w8: v1(5053.23,4500) 5283.67,4730.44 5283.67,5453.67 6350,6520 v1(6490,6520)
  Bottom Layer w8: R413_2.2@6375.39,6620 6375.39,6619.02 6471.42,6522.99 6487.01,6522.99 v1(6490,6520)
  other v1: 4825.87,4500 4882.71,4500 4939.55,4500 4996.39,4500 4825.87,4554.19 4825.87,4680
EFUSE_RAW_OUT3: D502_3.2 Q503_3.5-6 R413_3.2 R1002_3.1 R1004_3.2 | length 2987.5
  Top Layer w8: R1004_3.2@5911.26,4365.71 6051.86,4365.71 6064.93,4378.78 R1002_3.1@6064.93,4427.41
  GND2 w8: v1(6157.36,4490) 6337.58,4670.22 6337.58,5356.43 6514.81,5533.66 6514.81,6725.19 v1(6490,6750)
  Bottom Layer w8: R413_3.2@6263.35,6620 6263.35,6620.98 6235.58,6648.75 6235.58,6691.13 6294.45,6750 v1(6490,6750)
  other v1: 5930,4490 5986.84,4490 6043.68,4490 6100.52,4490 5930,4546.84 5930,4603.68 5930,4660.52
EFUSE_RAW_OUT4: D502_4.2 Q503_4.5-6 R413_4.2 R1002_4.1 R1004_4.2 | length 3128.1
  Top Layer w8: R1004_4.2@3890.4,7020.2 3890.4,6879.6 3903.47,6866.53 3943.82,6866.53 R1002_4.1@3947.28,6870
  GND2 w8: v1(4025.97,6782.64) 4567.56,6782.64 4610.2,6740 5117.19,6740 5172,6794.81 6477.5,6794.81 6479.32,6792.99 6487.01,6792.99 v1(6490,6790)
  Bottom Layer w8: R413_4.2@6161.58,6620 6161.58,6651.58 6300,6790 v1(6490,6790)
  other v1: 4025.97,6839.48 4025.97,6896.32 4025.97,6953.16 4025.97,7010 4082.81,7010 4139.65,7010 4196.49,7010
EN/UVLO_1: IC501_1.1 R501_1.1 R502_1.2 | length 208
  Top Layer w8: IC501_1.1@4801.68,6195.12 4802.27,6195.7 4813.99,6195.7
  Top Layer w10: 4813.99,6195.7 4849.62,6231.33 ; R502_1.2@4849.62,6293.43 4849.62,6231.33 ; R501_1.1@4908.49,6288.03 4908.49,6287.05 4898.73,6277.29 4895.57,6277.29 4849.62,6231.33
EN/UVLO_2: IC501_2.1 R501_2.1 R502_2.2 | length 208
  Top Layer w8: 4543.2,5280.28 4543.2,5268.56 IC501_2.1@4543.78,5267.98
  Top Layer w10: R502_2.2@4445.47,5315.91 4507.57,5315.91 ; R501_2.1@4450.87,5374.79 4451.85,5374.79 4461.61,5365.03 4461.61,5361.87 4507.57,5315.91 ; 4543.2,5280.28 4507.57,5315.91
EN/UVLO_3: IC501_3.1 R501_3.1 R502_3.2 | length 208
  Top Layer w8: 5643.2,5276.8 5643.2,5265.08 IC501_3.1@5643.78,5264.5
  Top Layer w10: R502_3.2@5545.47,5312.43 5607.57,5312.43 ; R501_3.1@5550.87,5371.31 5551.85,5371.31 5561.61,5361.54 5561.61,5358.39 5607.57,5312.43 ; 5643.2,5276.8 5607.57,5312.43
EN/UVLO_4: IC501_4.1 R501_4.1 R502_4.2 | length 208
  Top Layer w8: IC501_4.1@4801.26,7292.95 4801.84,7293.53 4813.56,7293.53
  Top Layer w10: 4813.56,7293.53 4849.19,7329.16 ; R502_4.2@4849.19,7391.26 4849.19,7329.16 ; R501_4.1@4908.07,7385.86 4908.07,7384.88 4898.3,7375.11 4895.15,7375.11 4849.19,7329.16
ENOUT: PROTECT.3 R416.2 U401.14 | length 2858.7
  Top Layer w8: v2(5305.31,6140) 5305.31,6144.23 5311.14,6150.06 5311.14,6274.92
  Top Layer w10: R416.2@5259.68,6325.39 R416.2@5259.87,6325.21 ; R416.2@5260.67,6325.39 5311.14,6274.92
  SIG w8: PROTECT.3@3358.19,7433.16 3568.35,7223 4507.26,7223 5303,6427.26 5303,6142.31 v2(5305.31,6140)
FAULT: PROTECT.2 R415.2 U401.13 | length 3037.4
  Top Layer w8: 5319.49,6297.87 5319.49,6292.03 5330.05,6281.47 5330.05,6249.62 5330.1,6249.57 5330.1,6214.39 U401.13@5330.83,6213.66 5330.83,6151.33 5337.93,6144.23 v2(5337.93,6140)
  Top Layer w10: 5319.49,6297.87 R415.2@5319.49,6325.39
  SIG w8: PROTECT.2@3240.08,7551.27 3301.35,7490 3383.16,7490 3633.16,7240 4514.31,7240 5320,6434.31 5320,6162.16 5337.93,6144.23 v2(5337.93,6140)
FLT_I1: "RIGHT ARM EFUSE.3" R506_1.1 | length 3927.5
  Top Layer w8: v2(4730,6380) 4730,6343.82 R506_1.1@4731.18,6342.64
  Bottom Layer w8: 3358.19,3480.94 3481.89,3604.65 3481.89,4793.47 3918,5229.58 3918,6248 4079,6409 4701,6409 v2(4730,6380)
FLT_I2: "LEFT LEG EFUSE.3" R506_2.1 | length 1511.3
  Top Layer w8: v2(4355.12,5197.48) R506_2.1@4396.26,5197.48
  SIG w8: 3360.66,4340.94 3704.99,4340.94 4340,4975.96 4340,5182.36 v2(4355.12,5197.48)
FLT_I3: "RIGHT LEG EFUSE.3" R506_3.1 | length 3305.9
  Top Layer w10: v2(5460,5194) R506_3.1@5496.26,5194
  SIG w8: 3360.4,3910.94 3596.9,3910.94 4281.96,4596 5077.15,4596 5731.69,5250.54 5731.69,5277.36 5719.16,5289.89 5555.89,5289.89 v2(5460,5194)
FLT_I4: LEFT_ARM_EFUSE.3 R506_4.1 | length 1655.7
  Top Layer w8: R506_4.1@4730.76,7440.47 v2(4730.76,7481.61)
  SIG w8: LEFT_ARM_EFUSE.3@3358.19,7863.16 3358.19,7719.79 3457.97,7620 v2(3640,7620)
  Bottom Layer w8: v2(3640,7620) 3665.96,7620 3702.96,7583 4629.37,7583 v2(4730.76,7481.61)
FLT_I_1: IC501_1.5 R506_1.2 R516_1.2 | length 306
  Top Layer w8: R516_1.2@4557.19,6154.57 4612.73,6154.57 4613.23,6154.07 4718.26,6154.07 4722.94,6158.76 IC501_1.5@4722.94,6195.12 4723.72,6195.9 4723.72,6243.37 4731.18,6250.83 R506_1.2@4731.18,6293.43
FLT_I_2: IC501_2.5 R506_2.2 R516_2.2 | length 306
  Top Layer w8: R506_2.2@4445.47,5197.48 4495.49,5197.48 4503.73,5189.24 IC501_2.5@4543.78,5189.24 4580.15,5189.24 4584.83,5184.55 4584.83,5023.98 R516_2.2@4584.33,5023.48
FLT_I_3: IC501_3.5 R506_3.2 R516_3.2 | length 325.1
  Top Layer w8: R506_3.2@5545.47,5194 5548.31,5196.83 5590.37,5196.83 5601.44,5185.76 5666.9,5185.76 5667.68,5184.98 5677.22,5184.98 5689.88,5172.31 5689.88,5109.5 5707,5092.38 5707,5042.67 5696.08,5031.75 5696.08,5030.76 5685.32,5020 R516_3.2@5684.33,5020
FLT_I_4: IC501_4.5 R506_4.2 R516_4.2 | length 310.7
  Top Layer w8: R516_4.2@4556.76,7252.4 4562.31,7246.85 4713.62,7246.85 4721.74,7254.96 4721.74,7292.17 IC501_4.5@4722.52,7292.95 4723.3,7293.73 4723.3,7330.92 4730.76,7338.38 R506_4.2@4730.76,7391.26
FLT_T1: "RIGHT ARM EFUSE.4" R505_1.1 | length 3908.3
  Top Layer w8: v2(4790,6380) 4790,6342.84 R505_1.1@4790.2,6342.64
  Bottom Layer w8: 3358.19,3599.06 3405.92,3646.78 3424.89,3646.78 3464.89,3686.78 3464.89,4800.51 3901,5236.62 3901,6255.04 4071.96,6426 4744,6426 v2(4790,6380)
FLT_T2: "LEFT LEG EFUSE.4" R505_2.1 | length 1502.9
  Top Layer w8: v2(4300,5080) 4300,5193.18 4364.3,5257.48 R505_2.1@4396.26,5257.48
  SIG w8: 3360.66,4459.06 3799.06,4459.06 4300,4960 v2(4300,5080)
FLT_T3: "RIGHT LEG EFUSE.4" R505_3.1 | length 2785
  Top Layer w10: v2(5444.17,5253.01) 5495.28,5253.01 R505_3.1@5496.26,5254
  SIG w8: 3360.4,4029.06 3367.35,4036 3673.88,4036 4267.88,4630 5063.07,4630 5435.19,5002.12 5435.19,5240.52 5444.17,5249.5 v2(5444.17,5253.01)
FLT_T4: LEFT_ARM_EFUSE.4 R505_4.1 | length 1819.8
  Top Layer w8: R505_4.1@4790.76,7440.47 v2(4790.76,7481.61)
  SIG w8: LEFT_ARM_EFUSE.4@3358.19,7981.27 3406.11,7933.35 3406.11,7695.91 3432.02,7670 v2(3640,7670)
  Bottom Layer w8: v2(3640,7670) 3710,7600 4653.42,7600 4771.81,7481.61 v2(4790.76,7481.61)
FLT_T_1: IC501_1.4 R505_1.2 R515_1.2 | length 373.6
  Top Layer w8: R515_1.2@4557.19,6098.9 4557.19,6099.89 4589.2,6131.9 4727.34,6131.9 4742.63,6147.19 4742.63,6193.56 4741.85,6194.34 4743.41,6195.9 4743.41,6230.64 4779.44,6266.66 4779.44,6282.66 4790.2,6293.43 R505_1.2@4791.18,6293.43
FLT_T_2: IC501_2.4 R505_2.2 R515_2.2 | length 373.6
  Top Layer w8: R505_2.2@4445.47,5257.48 4445.47,5256.49 4456.24,5245.73 4472.24,5245.73 4508.26,5209.7 4543,5209.7 4544.56,5208.14 4545.34,5208.92 4591.71,5208.92 4605.19,5195.45 4605.19,5057.31 4639.02,5023.48 R515_2.2@4640,5023.48
FLT_T_3: IC501_3.4 R505_3.2 R515_3.2 | length 373.5
  Top Layer w8: R505_3.2@5545.47,5254 5545.47,5253.01 5556.24,5242.25 5572.24,5242.25 5608.26,5206.22 5643,5206.22 5644.56,5204.66 5645.34,5205.44 5691.6,5205.44 5706.88,5190.16 5706.88,5116.54 5728.25,5095.17 5728.25,5030.76 5739.02,5020 R515_3.2@5740,5020
FLT_T_4: IC501_4.4 R505_4.2 R515_4.2 | length 376.3
  Top Layer w8: R515_4.2@4556.76,7197.71 4588.89,7229.85 4725.03,7229.85 4742.2,7247.02 4742.2,7316.22 4742.98,7317 4742.98,7326.38 4750.6,7334 4759.98,7334 4779.01,7353.03 4779.01,7380.49 4789.77,7391.26 R505_4.2@4790.76,7391.26
G_1: IC501_1.11 Q501_1.1 R514_1.1 | length 286.9
  Top Layer w8: 4589.23,6020.95 IC501_1.11@4624.52,6020.95
  Top Layer w20: Q501_1.1@4423.41,6127.88 4423.41,6125.03 4429.26,6119.18 4429.26,6090.89 4520.9,5999.26 4520.9,5998.27 4525.66,5993.51 R514_1.1@4526.65,5993.51 4561.79,5993.51 4589.23,6020.95
G_2: IC501_2.11 Q501_2.1 R514_2.1 | length 286.9
  Top Layer w8: 4717.95,5055.53 IC501_2.11@4717.95,5090.81
  Top Layer w20: Q501_2.1@4611.02,4889.71 4613.87,4889.71 4619.72,4895.56 4648.01,4895.56 4739.65,4987.19 4740.63,4987.19 4745.39,4991.96 R514_2.1@4745.39,4992.94 4745.39,5028.09 4717.95,5055.53
G_3: IC501_3.11 Q501_3.1 R514_3.1 | length 286.9
  Top Layer w8: 5817.95,5052.05 IC501_3.11@5817.95,5087.33
  Top Layer w20: Q501_3.1@5711.02,4886.22 5716.87,4892.07 5748.01,4892.07 5839.65,4983.71 5840.63,4983.71 5845.39,4988.48 5845.39,5024.61 5817.95,5052.05
G_4: IC501_4.11 Q501_4.1 R514_4.1 | length 288.8
  Top Layer w8: 4588.81,7118.78 IC501_4.11@4624.09,7118.77
  Top Layer w20: Q501_4.1@4422.99,7225.7 4424.77,7223.92 4424.77,7188.72 4517.39,7096.1 4521.46,7096.1 R514_4.1@4526.22,7091.33 4561.37,7091.33 4588.81,7118.78
GATE: D402.1 D404.2 R408.1 R409.2 R410.2 U401.6 | length 1003.7
  Top Layer w8: 5370.22,6094.38 5370.22,6046.36 5370.93,6045.61 5370.93,6010.43 5370.98,6010.38 5370.98,5984.13 5380,5975.11
  Top Layer w20: v2(5180,6450.12) D404.2@5240,6450.12 5325.94,6450.12 5339.02,6437.05 R408.1@5340,6437.05 5344.76,6441.81 5353.7,6441.81 5405.24,6493.35 5405.24,6494.33 R409.2@5410,6499.09 R410.2@5410,6599.09 ; 5370.22,6094.38 5380.59,6104.75 5411.11,6104.75 v2(5411.8,6105.44) ; 5380,5975.11 5380,5974.89 5395.28,5959.62 D402.1@5395.28,5949.6
  Bottom Layer w20: v2(5180,6450.12) 5219.34,6410.78 5219.34,6302.17 5368.74,6152.76 5368.74,6148.5 v2(5411.8,6105.44)
GATE1: Q201.1 U201.5 | length 620.4
  Top Layer w20: v2(5870,7840) U201.5@5936.58,7840 ; v2(5898.14,7465.24) 5898.83,7464.54 5898.83,7460.05 5940.78,7418.09 5940.78,7353.94 Q201.1@5945.35,7349.37
  Bottom Layer w20: v2(5870,7840) 5844.54,7814.54 5844.54,7500.22 5858.69,7486.08 5876.31,7486.08 5897.16,7465.24 v2(5898.14,7465.24)
GATE2: Q202.1 U202.5 | length 546.4
  Top Layer w20: U202.5@6054.1,7533.56 v2(6125,7533.56) ; Q202.1@6398.98,7349.37 6398.98,7388.74 6450,7439.76 v2(6450,7440)
  Bottom Layer w20: v2(6125,7533.56) 6218.56,7440 v2(6450,7440)
GND: "48V OUT.1" "BATTERY IN1.2" "BATTERY IN2.2" "LEFT ARM SENSOR.1" "LEFT ARM.1" "LEFT LEG.1" "PROTECT OUT.1" "RIGHT ARM SENSOR.1" "RIGHT ARM.1" "RIGHT LEG SENSOR.1" "RIGHT LEG.1" C201.1 C202.1 C203.1 C204.2 C205.2 C206.1 C207.1 C208.1 C401.1 C403.1 C500_1.2 C500_2.2 C500_3.2 C500_4.2 C501_1.1 C501_2.1 C501_3.1 C501_4.1 C502_1.1 C502_2.1 C502_3.1 C502_4.1 C503_1.1 C503_2.1 C503_3.1 C503_4.1 C507_1.2 C507_2.2 C507_3.2 C507_4.2 C508_1.2 C508_2.2 C508_3.2 C508_4.2 C509_1.2 C509_2.2 C509_3.2 C509_4.2 C1001_1.2 C1001_2.2 C1001_3.2 C1001_4.2 C1003_1.1 C1003_2.1 C1003_3.1 C1003_4.1 C1004_1.1 C1004_2.1 C1004_3.1 C1004_4.1 D201.2 D202.2 D203.2 D401.2 D501_1.2 D501_2.2 D501_3.2 D501_4.2 D502_1.1 D502_2.1 D502_3.1 D502_4.1 IC501_1.6 IC501_2.6 IC501_3.6 IC501_4.6 J408.1 J711.1 J712.1 J715.1 J716.1 J?.15 Q504_1.2 Q504_2.2 Q504_3.2 Q504_4.2 R403.1 R407.1 R502_1.1 R502_2.1 R502_3.1 R502_4.1 R503_1.1 R503_2.1 R503_3.1 R503_4.1 R504_1.1 R504_2.1 R504_3.1 R504_4.1 U201.2 U201.3 U202.2 U202.3 U401.12 U1001_1.1 U1001_1.2 U1001_1.7 U1001_2.1 U1001_2.2 U1001_2.7 U1001_3.1 U1001_3.2 U1001_3.7 U1001_4.1 U1001_4.2 U1001_4.7 | length 2715.6
  Top Layer w8: U1001_4.7@3815.43,7220.71 3816.61,7221.88 3816.61,7254.22 3834.94,7272.55 v2(3835.73,7272.55) 3879.61,7316.44 3879.61,7341.76 3874.49,7346.89 ; U1001_1.7@3816.02,6083.53 3817.19,6084.7 3817.19,6117.04 3831.34,6131.19 v2(3831.34,6133.27) 3832.17,6133.27 3856.24,6157.34 ; U1001_4.2@3854.8,7390 3854.8,7366.57 3874.49,7346.89 ; U1001_1.2@3855.39,6252.82 3855.39,6193.04 3856.24,6192.18 3856.24,6157.34 ; U1001_4.1@3874.49,7390 3874.49,7346.89 ; U1001_1.1@3875.07,6252.82 3875.07,6176.17 3856.24,6157.34 ; U1001_2.2@4444.8,4334.4 4518.94,4334.4 ; U1001_2.1@4444.8,4354.09 4499.25,4354.09 v2(4558.45,4294.89) 4558.52,4294.96 4614.02,4294.96 U1001_2.7@4614.09,4295.03 ; v2(4479.12,5171.23) 4480.02,5170.33 4543,5170.33 IC501_2.6@4543.78,5169.55 ; IC501_4.6@4702.83,7292.95 4703.54,7293.65 4703.54,7346.25 v2(4704.24,7346.95) ; IC501_1.6@4703.26,6195.12 4704.04,6195.9 4704.04,6258.78 v2(4705.59,6260.33) ; U401.12@5350.51,6213.66 5350.51,6283.21 5354.81,6287.51 v2(5354.81,6291.74) ; U1001_3.2@5541.46,4330.12 5613.8,4330.12 ; U1001_3.1@5541.46,4349.8 5594.12,4349.8 5613.8,4330.12 ; v2(5580.09,5172.02) 5584.32,5172.02 5590.27,5166.07 IC501_3.6@5642.22,5166.07 ; U1001_3.7@5710.75,4290.75 5710.68,4290.82 5653.1,4290.82 v2(5653.03,4290.88) 5613.8,4330.12 ; C203.1@5960.02,7663.44 5970.78,7674.2 5970.78,7680.49 6003.34,7713.05 6018.73,7713.05 6029.5,7723.81 C208.1@6029.5,7724.8 6030,7725.3 v2(6030,7760)
  Bottom Layer w8: Q504_2.2@4680.06,5164.59 4687.94,5164.59 4703.62,5180.28 4703.62,5210.5 4773.57,5280.45 C508_2.2@4774.55,5280.45 ; Q504_4.2@4697.87,7156.67 4697.87,7148.79 4713.56,7133.11 4743.78,7133.11 C508_4.2@4813.72,7063.16 ; Q504_1.2@4698.47,6040.8 4698.47,6032.93 4714.15,6017.24 4744.37,6017.24 4814.32,5947.3 v2(4814.32,5890) ; C507_2.2@4707.32,5324.96 4708.39,5326.02 4729.4,5326.02 4751.35,5347.98 v2(4751.35,5352.2) ; C508_2.2@4775.54,5280.45 4808.46,5280.45 4820.92,5267.98 v2(4825.15,5267.98) ; v2(4779.09,7010.31) 4779.09,7014.53 4790.06,7025.51 4790.06,7037.53 C508_4.2@4813.72,7061.19 ; C507_4.2@4858.24,7129.41 4858.24,7098.25 4879.37,7077.12 v2(4879.37,7072.89) ; C507_1.2@4858.83,6013.54 4859.82,6013.54 4874.5,5998.86 4877.7,5998.86 4892.23,5984.32 4892.23,5983.83 4892.72,5983.34 4892.72,5940.15 v2(4870,5917.42) ; Q504_3.2@5780.06,5161.11 5787.94,5161.11 5803.62,5176.8 5803.62,5207.02 5873.57,5276.96 C508_3.2@5874.55,5276.96 5882.27,5269.24 5897.61,5269.24 5906.48,5260.38 v2(5923.5,5243.35) ; C507_3.2@5807.32,5321.48 5833.71,5321.48 v2(5852.23,5340)
  other v1: 5549.61,7632.64 5549.61,7670 5549.61,7707.36
  other v2: 4000,3500 4250,3500 4500,3500 4750,3500 5000,3500 5250,3500 5500,3500 5750,3500 6000,3500 6250,3500 3125,3750 6625,3750 4000,4000 6500,4000 4529.57,4120 4566.93,4120 4604.29,4120 5630.42,4120 5667.78,4120 5705.14,4120 4712.64,4245 4750,4245 4787.36,4245 3125,4250 4125,4250 5125,4250 6375,4250 6625,4250 5925.05,4270 5974.34,4270 6023.63,4270 3000,4500 6250,4500 3125,4750 3875,4750 4409.56,4960.44 3000,5000 3500,5000 4000,5000 4250,5000 6250,5000 6500,5000 4364.81,5017.48 4364.81,5077.48 4364.81,5137.48 3125,5250 3375,5250 5125,5250 6625,5250 5455.12,5310 5455.12,5370 3000,5500 3250,5500 3125,5750 4875,5750 3770.4,5910.26 3770.4,5947.62 3770.4,5984.98 3000,6000 3250,6000 4000,6000 4287.61,6040 4324.97,6040 4362.33,6040 5229.37,6231.07 3125,6250 5555.09,6330 5555.09,6390 5175.81,6410 3000,6500 3250,6500 4500,6500 4620,6510.67 4620,6548.03 4620,6585.4 3125,6750 5182.28,6770 5230,6770 3000,7000 3250,7000 6500,7000 3767.8,7047.44 3767.8,7084.8 3767.8,7122.16 3674.61,7152.88 3125,7250 3600,7370 5959.67,7460.05 4849.19,7477.42 4610,7481.61 5893.94,7526.3 3125,7750 3875,7750 4375,7750 3000,8000 3500,8000 4000,8000 3875,8250 4375,8250 5625,8250 5875,8250 6375,8250 3000,8500 3500,8500 3750,8500 4000,8500 4250,8500 4500,8500 4750,8500 5250,8500 5500,8500 5750,8500 6000,8500 6250,8500 6500,8500
I_SENSE_N: "PROTECT OUT.2" C500_1.1 C500_2.1 C500_3.1 C500_4.1 C501_1.2 C501_2.2 C501_3.2 C501_4.2 C502_1.2 C502_2.2 C502_3.2 C502_4.2 D501_1.1 D501_2.1 D501_3.1 D501_4.1 J408.2 R405.2 R406.2 R413.2 R501_1.2 R501_2.2 R501_3.2 R501_4.2 R508_1.2 R508_2.2 R508_3.2 R508_4.2 R509_1.2 R509_2.2 R509_3.2 R509_4.2 R510_1.2 R510_2.2 R510_3.2 R510_4.2 R511_1.1 R511_2.1 R511_3.1 R511_4.1 R512_1.2 R512_2.2 R512_3.2 R512_4.2 R513_1.2 R513_2.2 R513_3.2 R513_4.2 U401.1 | length 7731
  Top Layer w8: R406.2@5195.02,6054.45 5203.14,6046.34 U401.1@5271.77,6046.34 5271.77,6020.44 5272.54,6019.68 5272.11,6019.26 U401.1@5272.11,6013.63 ; U401.1@5270.87,6013.98 5270.01,6013.13 5265.36,6013.13 5265.18,6012.95 5228.14,6012.95 5194.51,5979.32 5194.51,5795.49 5293.69,5696.31 5335.31,5696.31 5340,5691.63 R405.2@5340,5602.72
  Top Layer w50: J408.2@3634.21,8063.78 3652.64,8045.35 3724.65,8045.35 3840,7930 4159.37,7930 4278.09,7811.28 R513_4.2@4278.09,7783.15 ; 4272.52,8063.78 4278.09,8058.2 R513_4.2@4278.09,7746.73 R512_4.2@4278.09,7554.37 4278.09,7543.54 4281.64,7540 4893.31,7540 4980.47,7627.16 D501_4.1@4980.47,7645.86 ; R512_1.2@4278.52,6456.54 R513_1.2@4278.52,6648.9 4933.3,6648.9 4962.59,6619.61 4962.59,6566.34 D501_1.1@4980.9,6548.03 ; R512_2.2@4282.36,4744.82 4073.54,4744.82 4070,4748.36 4070,5399.6 4099.29,5428.89 4173.37,5428.89 4190.87,5446.38 4291.34,5446.38 ; 5157.87,5446.76 5309.57,5446.76 5309.57,5443.71 5393.7,5359.57 5393.7,4744.88 5390.16,4741.33 R512_3.2@5382.36,4741.33 ; R513_3.2@5190.39,4741.72 R512_3.2@5381.98,4741.72
  SIG w8: v1(5098.58,7546.91) 5355.49,7290 6435.91,7290 v1(6481.81,7244.1)
  Bottom Layer w8: R413.2@6263.35,7170 6273.28,7179.93 6273.28,7191.55 6283.98,7202.25 6439.96,7202.25 v1(6481.81,7244.1)
  Bottom Layer w15: R508_1.2@4961.96,6013.54 4968.26,6007.25 4988,6007.25 5018.19,5977.05 5018.19,5973.75 v1(5019.84,5972.1)
  other v1: 4508.03,5420.92 5610.39,5420.92 6319.05,5420.92 6555.27,5420.92 3996.22,5499.66 4074.96,5499.66 4389.92,5499.66 4468.66,5499.66 4547.4,5499.66 4783.62,5499.66 4862.36,5499.66 4941.1,5499.66 5019.84,5499.66 5098.58,5499.66 5413.54,5499.66 5492.28,5499.66 5571.02,5499.66 5649.76,5499.66 5807.24,5499.66 5885.98,5499.66 5964.72,5499.66 6043.46,5499.66 6122.2,5499.66 6200.94,5499.66 6515.9,5499.66 6594.64,5499.66 4035.59,5578.4 4114.33,5578.4 4193.07,5578.4 4429.29,5578.4 4508.03,5578.4 4586.77,5578.4 4822.99,5578.4 4901.73,5578.4 4980.47,5578.4 5059.21,5578.4 5137.95,5578.4 5216.69,5578.4 5452.91,5578.4 5531.65,5578.4 5610.39,5578.4 5689.13,5578.4 5767.87,5578.4 5846.61,5578.4 5925.35,5578.4 6082.83,5578.4 6161.57,5578.4 6240.31,5578.4 6319.05,5578.4 6555.27,5578.4 4267.56,5582.65 5019.84,5657.14 5098.58,5657.14 5177.32,5657.14 5059.21,5735.88 5137.95,5735.88 5019.84,5814.62 5098.58,5814.62 5059.21,5901.35 5098.58,5972.1 5059.21,6050.84 4980.47,6208.32 5019.84,6287.06 5098.58,6287.06 5059.21,6365.8 5019.84,6444.54 5098.58,6444.54 5059.21,6523.29 5019.84,6916.99 5098.58,6916.99 5053.14,6989.65 5098.58,7074.47 5059.21,7468.17 5059.21,7625.65
I_SENSE_P: Q403.Tab Q404.Tab R405.1 U401.2 | length 566.3
  Top Layer w8: U401.2@5291.46,6046.34 5290.73,6045.61 5290.73,6006.08 5279.6,5994.95 5235.6,5994.95 5212.51,5971.86 5212.51,5802.95 5301.14,5714.31 5335.31,5714.31 5340,5719 R405.1@5340,5817.28
  other v1: 5433.07,5748.03 5511.81,5748.03 5472.44,5826.77 5551.18,5826.77 5511.81,5905.52 5470.69,5969.91 5552.85,5982.59
IMON_1: IC501_1.7 R503_1.2 | length 103.4
  Top Layer w8: 4671.28,6255.86 4683.57,6243.56 IC501_1.7@4683.57,6195.12
  Top Layer w10: R503_1.2@4671.18,6293.43 4671.18,6255.95 4671.28,6255.86
IMON_2: IC501_2.7 R503_2.2 | length 103.4
  Top Layer w8: 4488.73,5146.86 4491.74,5149.87 IC501_2.7@4543.78,5149.87
  Top Layer w10: R503_2.2@4445.47,5137.48 4479.35,5137.48 4488.73,5146.86
IMON_3: IC501_3.7 R503_3.2 | length 103.4
  Top Layer w8: 5583.13,5146.39 IC501_3.7@5643.78,5146.39
  Top Layer w10: R503_3.2@5545.47,5134 5570.74,5134 5583.13,5146.39